# Altium PCB VCA_Front.PcbDoc
Units mm, origin at the board's own origin, x right, y up, seen from the top; angles counter-clockwise.
Board outline 30 x 128.5 mm, 2 copper layers (Top Layer, Bottom Layer); 4 components, 0 nets, 56 pads, 0 vias.
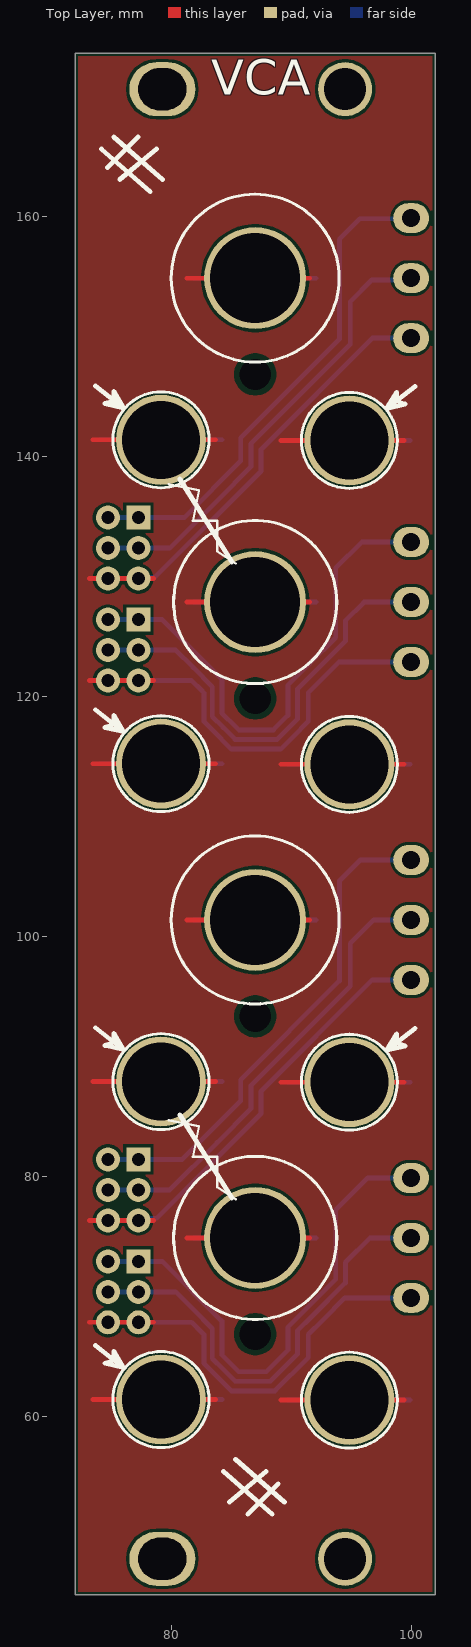
[diagram p0: Top Layer view]
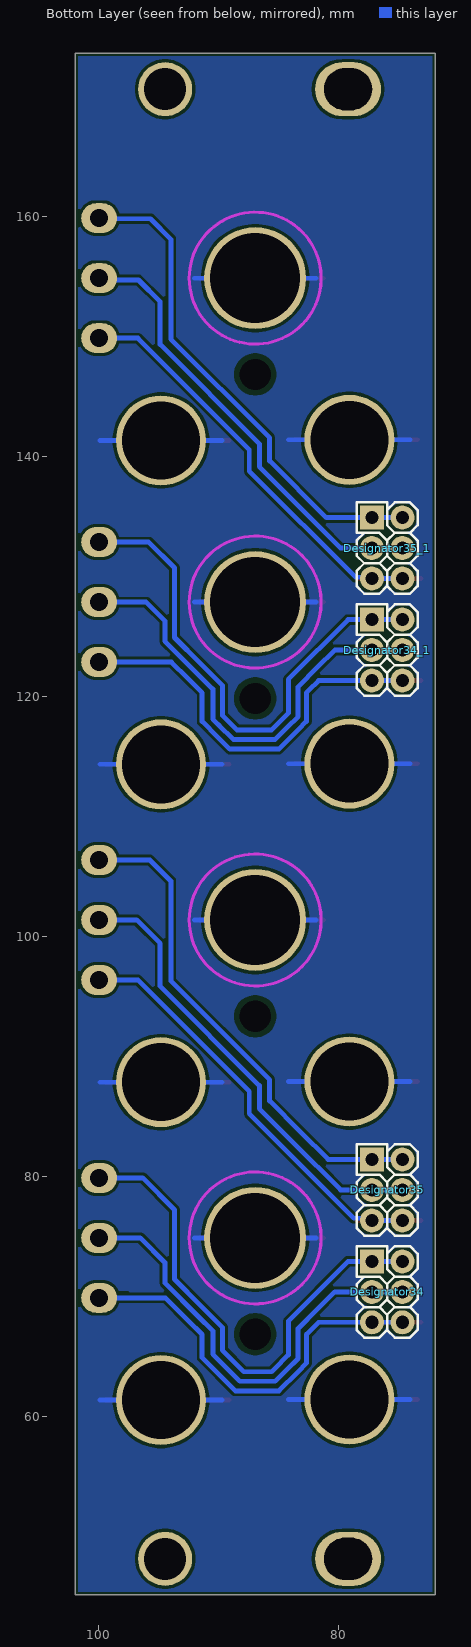
[diagram p1: Bottom Layer view, seen from below]

## Layer stack, top to bottom
Top Solder: solder mask 0.0102, Solder Resist, Dk 3.5
Top Layer: signal copper 0.0356
Dielectric 1: dielectric 0.32, FR-4, Dk 4.8
Bottom Layer: signal copper 0.0356
Bottom Solder: solder mask 0.0102, Solder Resist, Dk 3.5

## Board outline
101.975,173.603 101.975,45.103 71.975,45.103 71.975,173.603

## Design rules (kind name [scope] priority, off if disabled: settings)
BoardOutlineClearance [All] p1: gap=0.254 ignorepadtopadclearanceinfootprint=FALSE except(0: Arc-SplitContinuation Track-SplitContinuation SMDPad-SplitContinuation THPad-SplitContinuation Via-SplitContinuation Fill-SplitContinuation Poly-SplitContinuation Region-SplitContinuation Text-SplitContinuation)
Clearance [All] p1: gap=0.254 ignorepadtopadclearanceinfootprint=FALSE
PolygonConnect [All] p1: connectstyle=Relief reliefconductorwidth=0.254 reliefentries=4 polygonreliefangle="90 Angle" airgapwidth=0.254
RoutingVias [All] p1: holewidth=0.711 width=1.27 viastyle="Through Hole" minholewidth=0.711 minwidth=1.27 maxholewidth=0.711 maxwidth=1.27
SolderMaskExpansion [All] p1: expansion=0.102 istentingtop=FALSE
Width [All] p1: maxlimit=0.4 minlimit=0.254 preferedwidth=0.254
30 further rules are at their usual default settings.

## Components (designator, comment, footprint, x,y, rotation, side; value= is the part's Value field where it differs from the comment)
Designator34 "Comment" "CON: PLD-6" 75.975,70.353 r270 bottom
Designator34_1 "Comment" "CON: PLD-6" 75.975,123.853 r270 bottom
Designator35 "Comment" "CON: PLD-6" 75.975,78.853 r270 bottom
Designator35_1 "Comment" "CON: PLD-6" 75.975,132.353 r270 bottom

## Footprints (in the part's own frame and the unit in brackets; to place one, negate y for a bottom-side part, rotate by r counter-clockwise, add the part's x,y. Pads: shape width x height; smd on the part's side, far side on the other; paste and mask are expansions set on the pad)
"CON: PLD-6" [mm]
  rect 2x2 hole 1.1: 1(-2.54,-1.27)
  round 2 hole 1.1: 2(-2.54,1.27) 3(0,-1.27) 4(0,1.27) 5(2.54,-1.27) 6(2.54,1.27)
  silkscreen extent -3.81,-2.54 3.81,2.54, body extent -3.81,-2.54 3.81,2.54, height 8.54

## Free pads (board coordinates)
  oval 3x2.5 hole 1.5: 2(99.975,69.853) 2(99.975,74.853) 2(99.975,79.853) 2(99.975,96.353) 2(99.975,101.353) 2(99.975,106.353) 2(99.975,122.853) 2(99.975,127.853) 2(99.975,132.853) 2(99.975,149.853) 2(99.975,154.853) 2(99.975,159.853)
  round 7.5 hole 6.5: 4(79.125,61.378) 4(79.125,141.378) 4(79.125,87.878) 4(79.125,114.378) 4(94.825,61.328) 4(94.825,141.328) 4(94.825,87.828) 4(94.825,114.328)
  oval 5.5x4.5 hole 3.5 slot 4 at 0 deg: 4(79.235,48.103) 4(79.235,170.603)
  round 1 hole 2.6: 4(86.975,66.825) 4(86.975,146.825) 4(86.975,93.325) 4(86.975,119.825)
  round 8.5 hole 7.5: 4(86.975,74.853) 4(86.975,154.853) 4(86.975,101.353) 4(86.975,127.853)
  round 4.5 hole 3.5: 4(94.475,48.103) 4(94.475,170.603)

## Nets (pads, with @x,y where several pads share a name; then routed paths per layer and width w, separated by ;. In a path a pad name is that pad's centre, name@x,y a point inside that pad or via, vN(x,y) a via of type N, cw(c..) or ccw(c..) an arc to the next point about the centre after c; other vN are vias at no path point)
pads on no net: Designator34.1 Designator34.2 Designator34.3 Designator34.4 Designator34.5 Designator34.6 Designator34_1.1 Designator34_1.2 Designator34_1.3 Designator34_1.4 Designator34_1.5 Designator34_1.6 Designator35.1 Designator35.2 Designator35.3 Designator35.4 Designator35.5 Designator35.6 Designator35_1.1 Designator35_1.2 Designator35_1.3 Designator35_1.4 Designator35_1.5 Designator35_1.6
copper on no net: | length 752.2
  Top Layer w0.4: 73.152,67.813 78.499,67.813 ; 73.152,76.313 78.499,76.313 ; 73.152,121.313 78.499,121.313 ; 73.152,129.813 78.499,129.813 ; 73.43,61.378 83.677,61.378 ; 73.43,87.878 83.677,87.878 ; 73.43,114.378 83.677,114.378 ; 73.43,141.378 83.677,141.378 ; 74.705,67.813 77.245,67.813 ; 74.705,121.313 77.245,121.313 ; 74.705,129.813 77.245,129.813 ; 81.28,74.853 91.527,74.853 ; 81.28,101.353 91.527,101.353 ; 81.28,127.853 91.527,127.853 ; 81.28,154.853 91.527,154.853 ; 89.13,61.328 99.377,61.328 ; 89.13,87.828 99.377,87.828 ; 89.13,114.328 99.377,114.328 ; 89.13,141.328 99.377,141.328
  Bottom Layer w0.4: 74.045,61.378 84.205,61.378 ; 74.045,87.878 84.205,87.878 ; 74.045,114.378 84.205,114.378 ; 74.045,141.378 84.205,141.378 ; 74.705,76.313 77.245,76.313 77.426,76.494 78.762,76.494 87.461,85.193 87.461,87.061 96.753,96.353 99.975,96.353 97.75,96.353 ; 74.705,121.313 79.229,121.313 81.687,121.313 82.5,120.5 82.7,120.3 82.7,118.8 82.7,117.9 83.4,117.2 85,115.6 86.7,115.6 89.1,115.6 90.1,116.6 91.4,117.9 91.4,119.4 91.4,120.3 92.6,121.5 93.953,122.853 97.75,122.853 99.975,122.853 ; 74.705,123.853 79.229,123.853 80.347,123.853 81.8,122.4 83.4,120.8 83.4,119.5 83.4,118.3 84.3,117.4 85.3,116.4 87.4,116.4 88.8,116.4 90,117.6 90.5,118.1 90.5,120 90.5,120.6 91.7,121.8 94.5,124.6 94.5,126.3 96.053,127.853 97.75,127.853 99.975,127.853 ; 74.705,126.393 79.229,126.393 84.2,121.422 84.2,119.3 84.2,118.6 85.4,117.4 85.6,117.2 88.5,117.2 89.7,118.4 89.7,119.2 89.7,120.9 91.5,122.7 93.7,124.9 93.7,128.8 93.7,130.7 95.853,132.853 97.75,132.853 99.975,132.853 ; 74.705,129.813 77.245,129.813 77.346,129.914 78.606,129.914 87.461,138.769 87.461,140.561 96.753,149.853 99.975,149.853 ; 74.705,132.353 79.229,132.353 79.853,132.353 83.8,136.3 86.625,139.125 86.625,141.051 94.9,149.327 94.9,152.4 94.9,152.9 96.7,154.7 100.5,154.7 ; 74.705,134.893 77.245,134.893 79.229,134.893 81.045,134.893 85.768,139.616 85.768,141.541 94,149.773 94,154.2 94,158.1 95.7,159.8 99.975,159.8 ; 81.895,74.853 92.055,74.853 ; 81.895,101.353 92.055,101.353 ; 81.895,127.853 92.055,127.853 ; 81.895,154.853 92.055,154.853 ; 89.745,61.328 99.905,61.328 ; 89.745,87.828 99.905,87.828 ; 89.745,114.328 99.905,114.328 ; 89.745,141.328 99.905,141.328 ; 99.827,70 99.975,69.853 99.827,69.853 97.75,69.853 94.453,69.853 92.6,68 91.4,66.8 91.4,65.9 91.4,64.88 88.62,62.1 86.7,62.1 85,62.1 83.4,63.7 82.7,64.4 82.7,65.3 82.7,66.8 82.5,67 81.687,67.813 79.229,67.813 ; 99.975,74.853 96.553,74.853 94.5,72.8 94.5,71.1 91.7,68.3 90.5,67.1 90.5,66.5 90.5,65.158 88.242,62.9 87.4,62.9 85.3,62.9 84.3,63.9 83.4,64.8 83.4,66 83.4,67.3 81.8,68.9 80.347,70.353 79.229,70.353 ; 99.975,79.853 96.353,79.853 93.7,77.2 93.7,75.3 93.7,71.4 91.5,69.2 89.7,67.4 89.7,65.7 89.7,65.488 87.912,63.7 85.6,63.7 85.4,63.9 84.2,65.1 84.2,65.8 84.2,67.922 79.229,72.893 ; 99.975,101.353 97.75,101.353 96.853,101.353 94.9,99.4 94.9,98.9 94.9,95.827 86.625,87.551 86.625,85.625 83.8,82.8 79.853,78.853 79.229,78.853 ; 99.975,106.353 97.75,106.353 95.753,106.353 94,104.6 94,100.7 94,96.273 85.768,88.041 85.768,86.268 83.2,83.7 80.893,81.393 79.229,81.393 ; 79.229,67.813 74.705,67.813 79.229,67.813 ; 79.229,70.353 74.705,70.353 79.229,70.353 ; 79.229,72.893 74.705,72.893 79.229,72.893 ; 79.229,78.853 74.705,78.853 79.229,78.853 ; 79.229,81.393 74.705,81.393 79.229,81.393

## Polygon pours and split planes (outlines as drawn)
no net on Bottom Layer "NONET_L02_P-001" (solid, pour order 0): 71.628,173.736 71.628,44.704 102.108,44.704 102.108,173.736
no net on Top Solder "NONET_L02_P-001" (solid): 90.996,61.574 90.996,62.637 cw(c93.036,61.628) 91.538,63.341 cw(c93.871,62.5) 92.037,64.169 cw(c93.53,62.454) 92.807,64.61 cw(c94.515,62.547) 93.728,65.107 95.855,65.138 cw(c95.598,63.683) 96.392,64.929 cw(c94.81,61.655) 97.708,63.852 cw(c96.265,62.263) 98.206,63.178 cw(c97.096,61.891) 98.614,62.656 98.614,65.302 ccw(c98.552,65.302) 98.552,65.364 90.932,65.364
no net on Top Solder "NONET_L02_P-001" (solid): 90.996,114.574 90.996,115.637 cw(c93.036,114.628) 91.538,116.341 cw(c93.871,115.5) 92.037,117.169 cw(c93.53,115.454) 92.807,117.61 cw(c94.515,115.547) 93.728,118.107 95.855,118.138 cw(c95.598,116.683) 96.392,117.929 cw(c94.81,114.655) 97.708,116.852 cw(c96.265,115.263) 98.206,116.178 cw(c97.096,114.891) 98.614,115.656 98.614,118.302 ccw(c98.552,118.302) 98.552,118.364 90.932,118.364
no net on Top Layer "NONET_L02_P-001" (solid, pour order 1): 71.628,173.736 71.628,45.212 102.108,45.212 102.108,173.736

## Keep-outs
Bottom Layer:
  circle w0.254: c86.975,74.853 r5.5
  circle w0.254: c86.975,101.353 r5.5
  circle w0.254: c86.975,127.853 r5.5
  circle w0.254: c86.975,154.853 r5.5

## Silkscreen, mask and mechanical layers (free items; w line width, h text height)
Top Overlay:
  circle w0.254: c94.825,61.328 r4
  circle w0.254: c94.825,114.328 r4
  circle w0.254: c79.125,61.378 r4
  circle w0.254: c94.825,141.328 r4
  circle w0.254: c79.125,141.378 r4
  circle w0.254: c94.825,87.828 r4
  circle w0.254: c79.125,87.878 r4
  circle w0.254: c79.125,114.378 r4
  circle w0.254: c86.975,101.353 r7
  circle w0.254: c86.975,74.853 r6.8
  circle w0.254: c86.975,127.853 r6.8
  circle w0.254: c86.975,154.853 r7
  lines w0.2: 79.756,84.668 82.296,84.16 81.788,81.62 83.82,81.62 83.82,79.08 85.344,78.064 ; 79.756,137.668 82.296,137.16 81.788,134.62 83.82,134.62 83.82,132.08 85.344,131.064
  lines w0.4: 73.66,65.872 76.013,64.031 ; 73.66,92.372 76.013,90.531 ; 73.66,118.872 76.013,117.031 ; 73.66,145.872 76.013,144.031 ; 74.168,165.608 78.232,162.052 ; 74.676,164.084 77.216,166.624 ; 74.972,64.564 74.457,64.401 76.013,64.031 ; 74.972,91.064 74.457,90.901 76.013,90.531 ; 74.972,117.564 74.457,117.401 76.013,117.031 ; 74.972,144.564 74.457,144.401 76.013,144.031 ; 75.184,64.856 75.18,65.396 76.013,64.031 ; 75.184,91.356 75.18,91.896 76.013,90.531 ; 75.184,117.856 75.18,118.396 76.013,117.031 ; 75.184,144.856 75.18,145.396 76.013,144.031 ; 75.184,166.624 79.248,163.068 ; 75.692,163.068 78.74,165.608 ; 80.684,85.121 85.03,78.186 ; 80.684,138.121 85.03,131.186 ; 84.328,55.372 88.392,51.816 ; 84.836,52.832 87.884,55.372 ; 85.344,56.388 89.408,52.832 ; 86.36,51.816 88.9,54.356 ; 98.765,91.306 98.769,91.846 97.937,90.481 ; 98.765,144.806 98.769,145.346 97.937,143.981 ; 98.978,91.014 99.492,90.851 97.937,90.481 ; 98.978,144.514 99.492,144.351 97.937,143.981 ; 100.289,92.322 97.937,90.481 ; 100.289,145.822 97.937,143.981
  text "VCA" at 83.314,169.164 h5
Top Solder:
  lines w0.254: 90.996,61.574 cw(c94.825,61.328) 98.622,61.875 ; 90.996,114.574 cw(c94.825,114.328) 98.622,114.875
  lines w0.4: 90.996,61.574 90.996,65.638 90.996,68.153 98.797,68.153 98.797,65.965 98.797,61.901 ; 90.996,114.574 90.996,118.638 90.996,121.153 98.797,121.153 98.797,118.965 98.797,114.901 ; 91.132,62.9 92.401,64.428 ; 91.132,115.9 92.401,117.428 ; 98.533,63.156 98.552,62.316 ; 98.533,116.156 98.552,115.316
  lines w0.8: 91.401,65.625 98.445,65.648 ; 91.401,118.625 98.445,118.648
  text "GAIN A" at 82.804,162.56 h3
  text "CV A" at 76.201,146.304 h3
  text "ENV A" at 91.9,146.254 h3
  text "A" at 78.423,119.197 h3
  text "OUT A" at 91.177,118.965 h3
  text "GAIN B" at 82.804,109.06 h3
  text "CV B" at 76.201,93.304 h3
  text "ENV B" at 91.9,93.254 h3
  text "B" at 78.423,66.197 h3
  text "OUT B" at 91.177,65.965 h3
Board Shape:
  the board outline again, w0.013
Mechanical 4:
  circle w0.254: c86.975,154.853 r7.525
  circle w0.254: c86.975,74.853 r7.525
  circle w0.254: c86.975,101.353 r7.525
  circle w0.254: c86.975,127.853 r7.525
  circle w0.013: c94.475,48.103 r1.75
  circle w0.013: c94.475,170.603 r1.75
  circle w0.013: c74.705,123.853 r0.55
  circle w0.013: c77.245,70.353 r0.55
  circle w0.013: c77.245,67.813 r0.55
  circle w0.013: c77.245,76.313 r0.55
  circle w0.013: c77.245,72.893 r0.55
  circle w0.013: c74.705,126.393 r0.55
  circle w0.013: c74.705,67.813 r0.55
  circle w0.013: c74.705,132.353 r0.55
  circle w0.013: c77.245,132.353 r0.55
  circle w0.013: c74.705,72.893 r0.55
  circle w0.013: c74.705,129.813 r0.55
  circle w0.013: c74.705,70.353 r0.55
  circle w0.013: c77.245,129.813 r0.55
  circle w0.013: c77.245,121.313 r0.55
  circle w0.013: c77.245,123.853 r0.55
  circle w0.013: c77.245,78.853 r0.55
  circle w0.013: c74.705,78.853 r0.55
  circle w0.013: c74.705,121.313 r0.55
  circle w0.013: c77.245,134.893 r0.55
  circle w0.013: c77.245,81.393 r0.55
  circle w0.013: c77.245,126.393 r0.55
  circle w0.013: c74.705,76.313 r0.55
  circle w0.013: c74.705,134.893 r0.55
  circle w0.013: c74.705,81.393 r0.55
  circle w0.013: c94.825,114.328 r3.25
  circle w0.013: c79.125,114.378 r3.25
  circle w0.013: c79.125,87.878 r3.25
  circle w0.013: c94.825,87.828 r3.25
  circle w0.013: c79.125,141.378 r3.25
  circle w0.013: c94.825,141.328 r3.25
  circle w0.013: c79.125,61.378 r3.25
  circle w0.013: c94.825,61.328 r3.25
  circle w0.013: c99.975,132.853 r0.75
  circle w0.013: c99.975,127.853 r0.75
  circle w0.013: c99.975,122.853 r0.75
  circle w0.013: c99.975,159.853 r0.75
  circle w0.013: c99.975,154.853 r0.75
  circle w0.013: c99.975,149.853 r0.75
  circle w0.013: c99.975,106.353 r0.75
  circle w0.013: c99.975,101.353 r0.75
  circle w0.013: c99.975,96.353 r0.75
  circle w0.013: c99.975,79.853 r0.75
  circle w0.013: c99.975,74.853 r0.75
  circle w0.013: c99.975,69.853 r0.75
  circle w0.013: c86.975,74.853 r3.75
  circle w0.013: c86.975,101.353 r3.75
  circle w0.013: c86.975,127.853 r3.75
  circle w0.013: c86.975,154.853 r3.75
  lines w0.013: 86.975,45.103 86.975,173.603 ; 78.235,46.353 cw(c78.235,48.103) 78.235,49.853 79.235,49.853 cw(c79.235,48.103) 79.235,46.353 78.235,46.353 ; 78.235,168.853 cw(c78.235,170.603) 78.235,172.353 79.235,172.353 cw(c79.235,170.603) 79.235,168.853 78.235,168.853